# Altium PCB PSOC_LAY.PcbDoc (part 1 of 3)
Units mm, origin at the board's own origin, x right, y up, seen from the top; angles counter-clockwise.
Board outline 239.8 x 205.26 mm, 2 copper layers (Top Layer, Bottom Layer); 186 components, 165 nets, 780 pads, 226 vias.
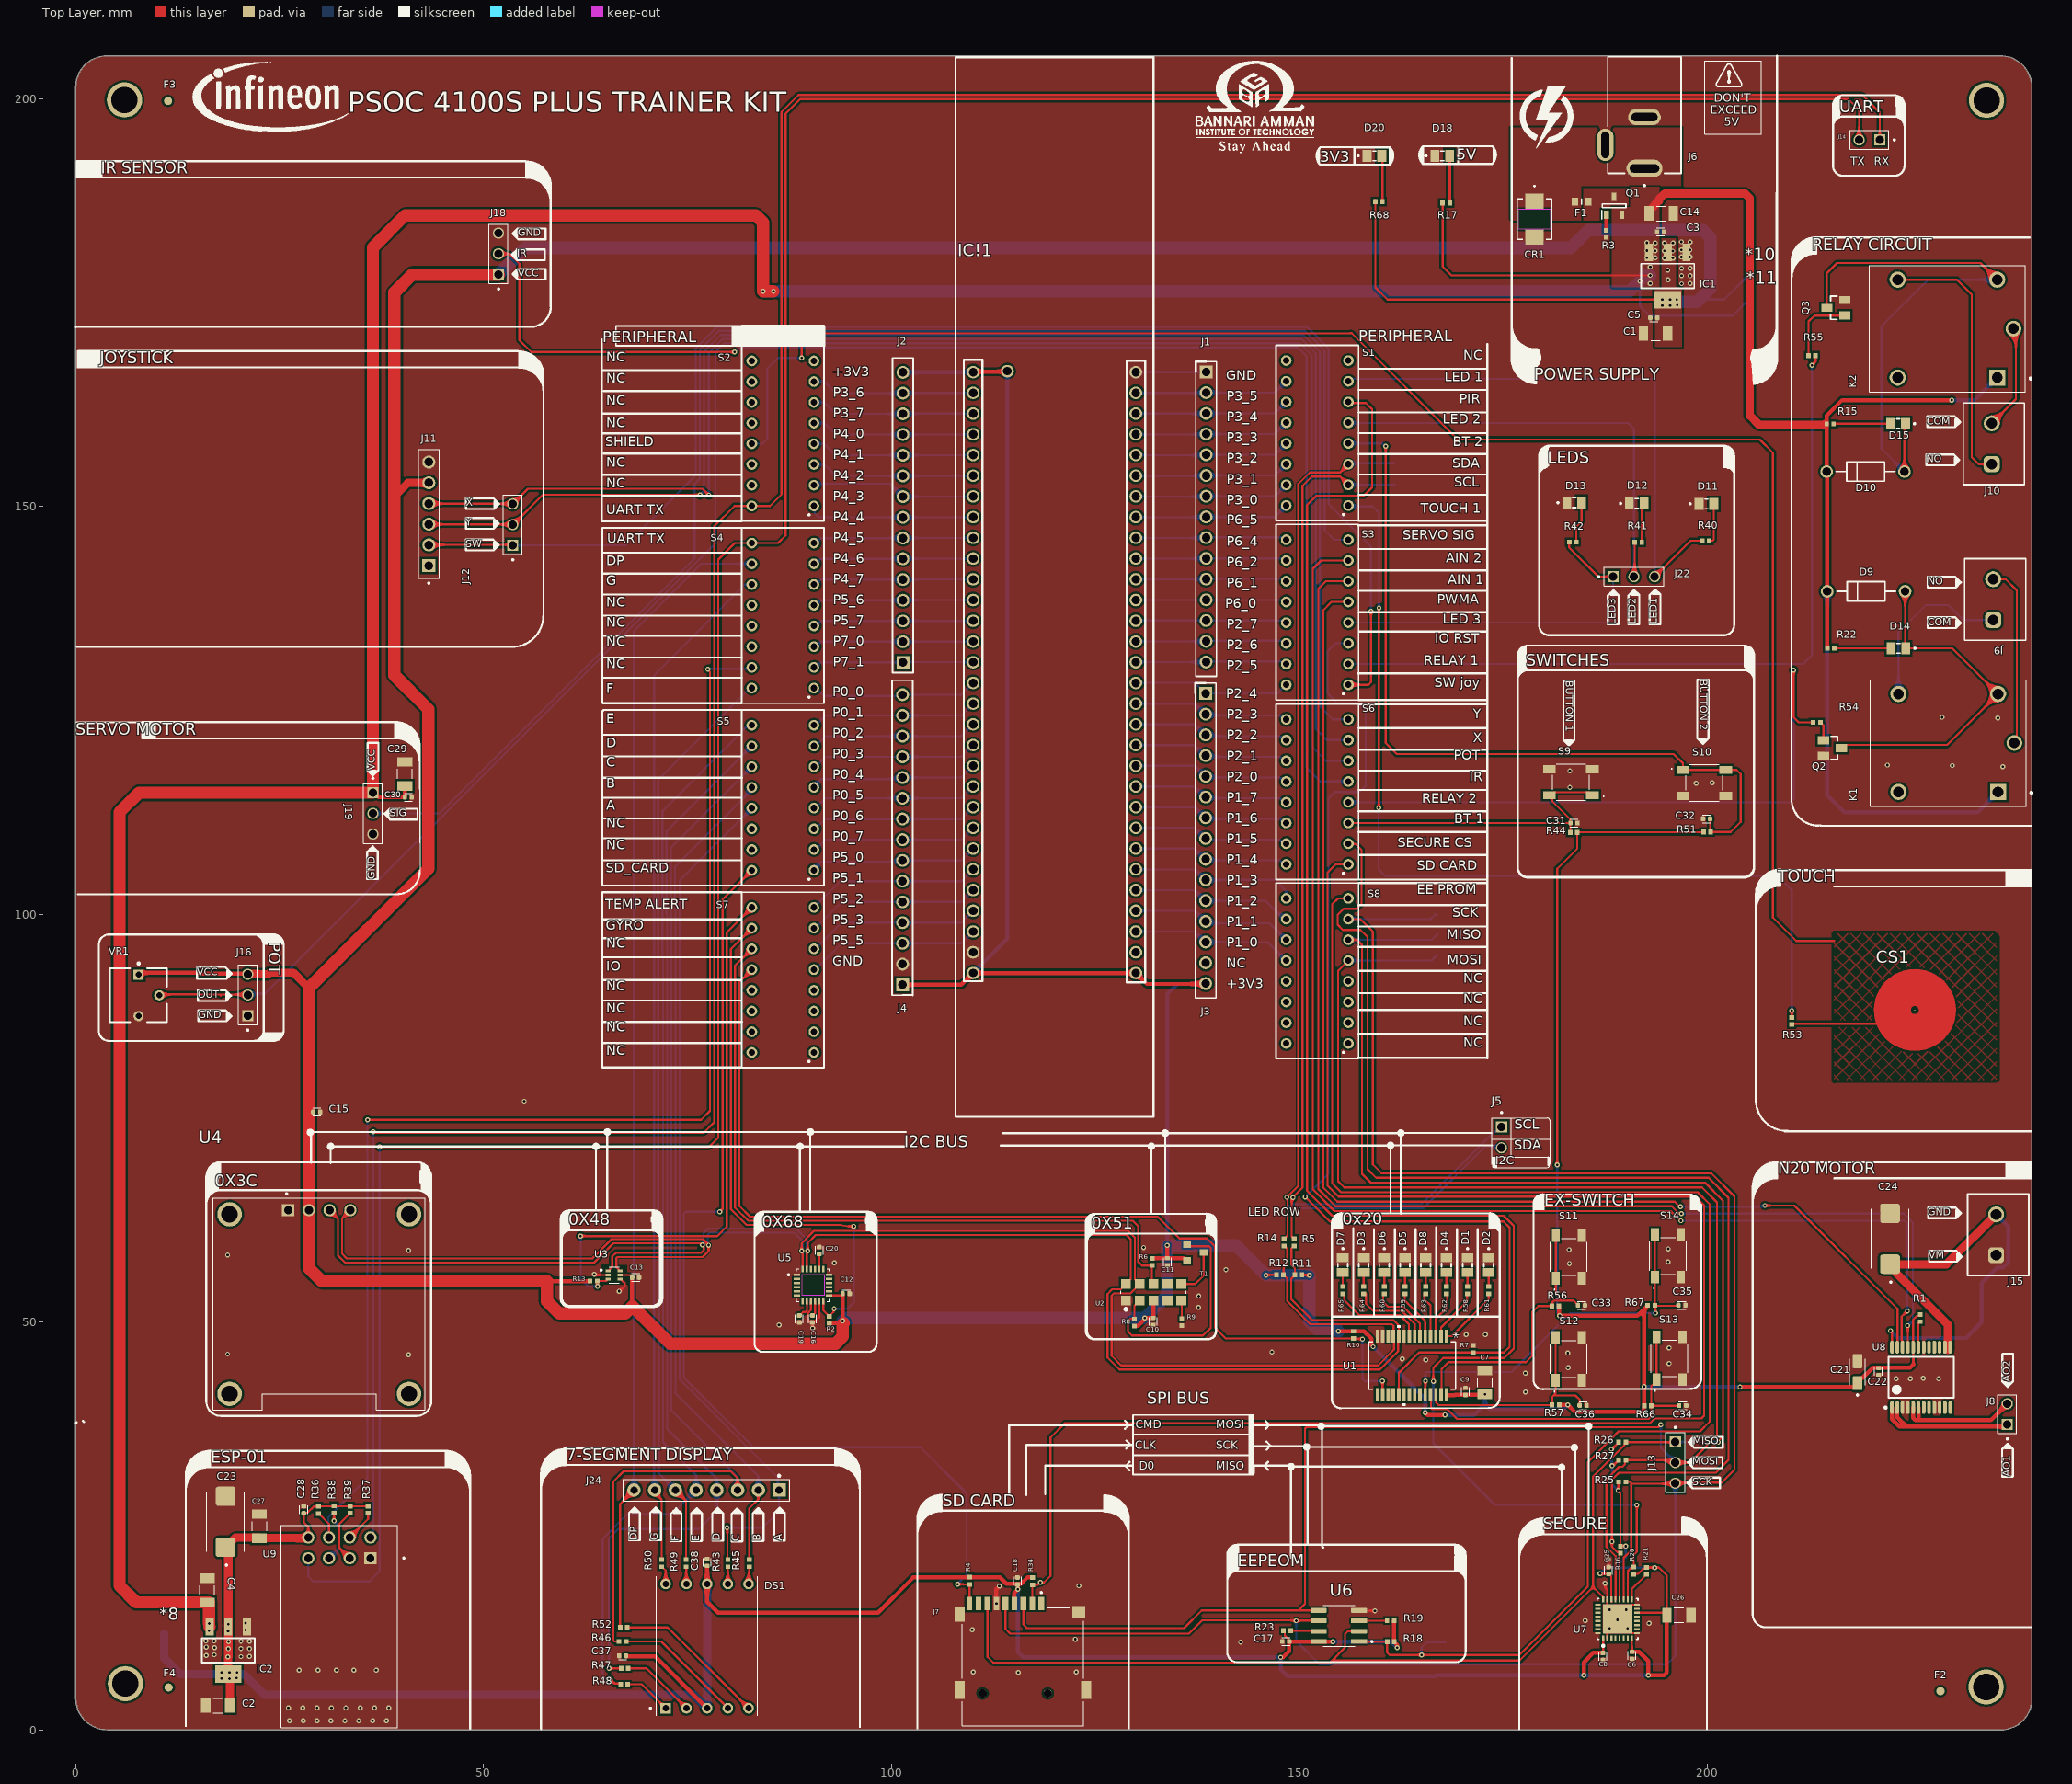
[diagram p0: Top Layer view]
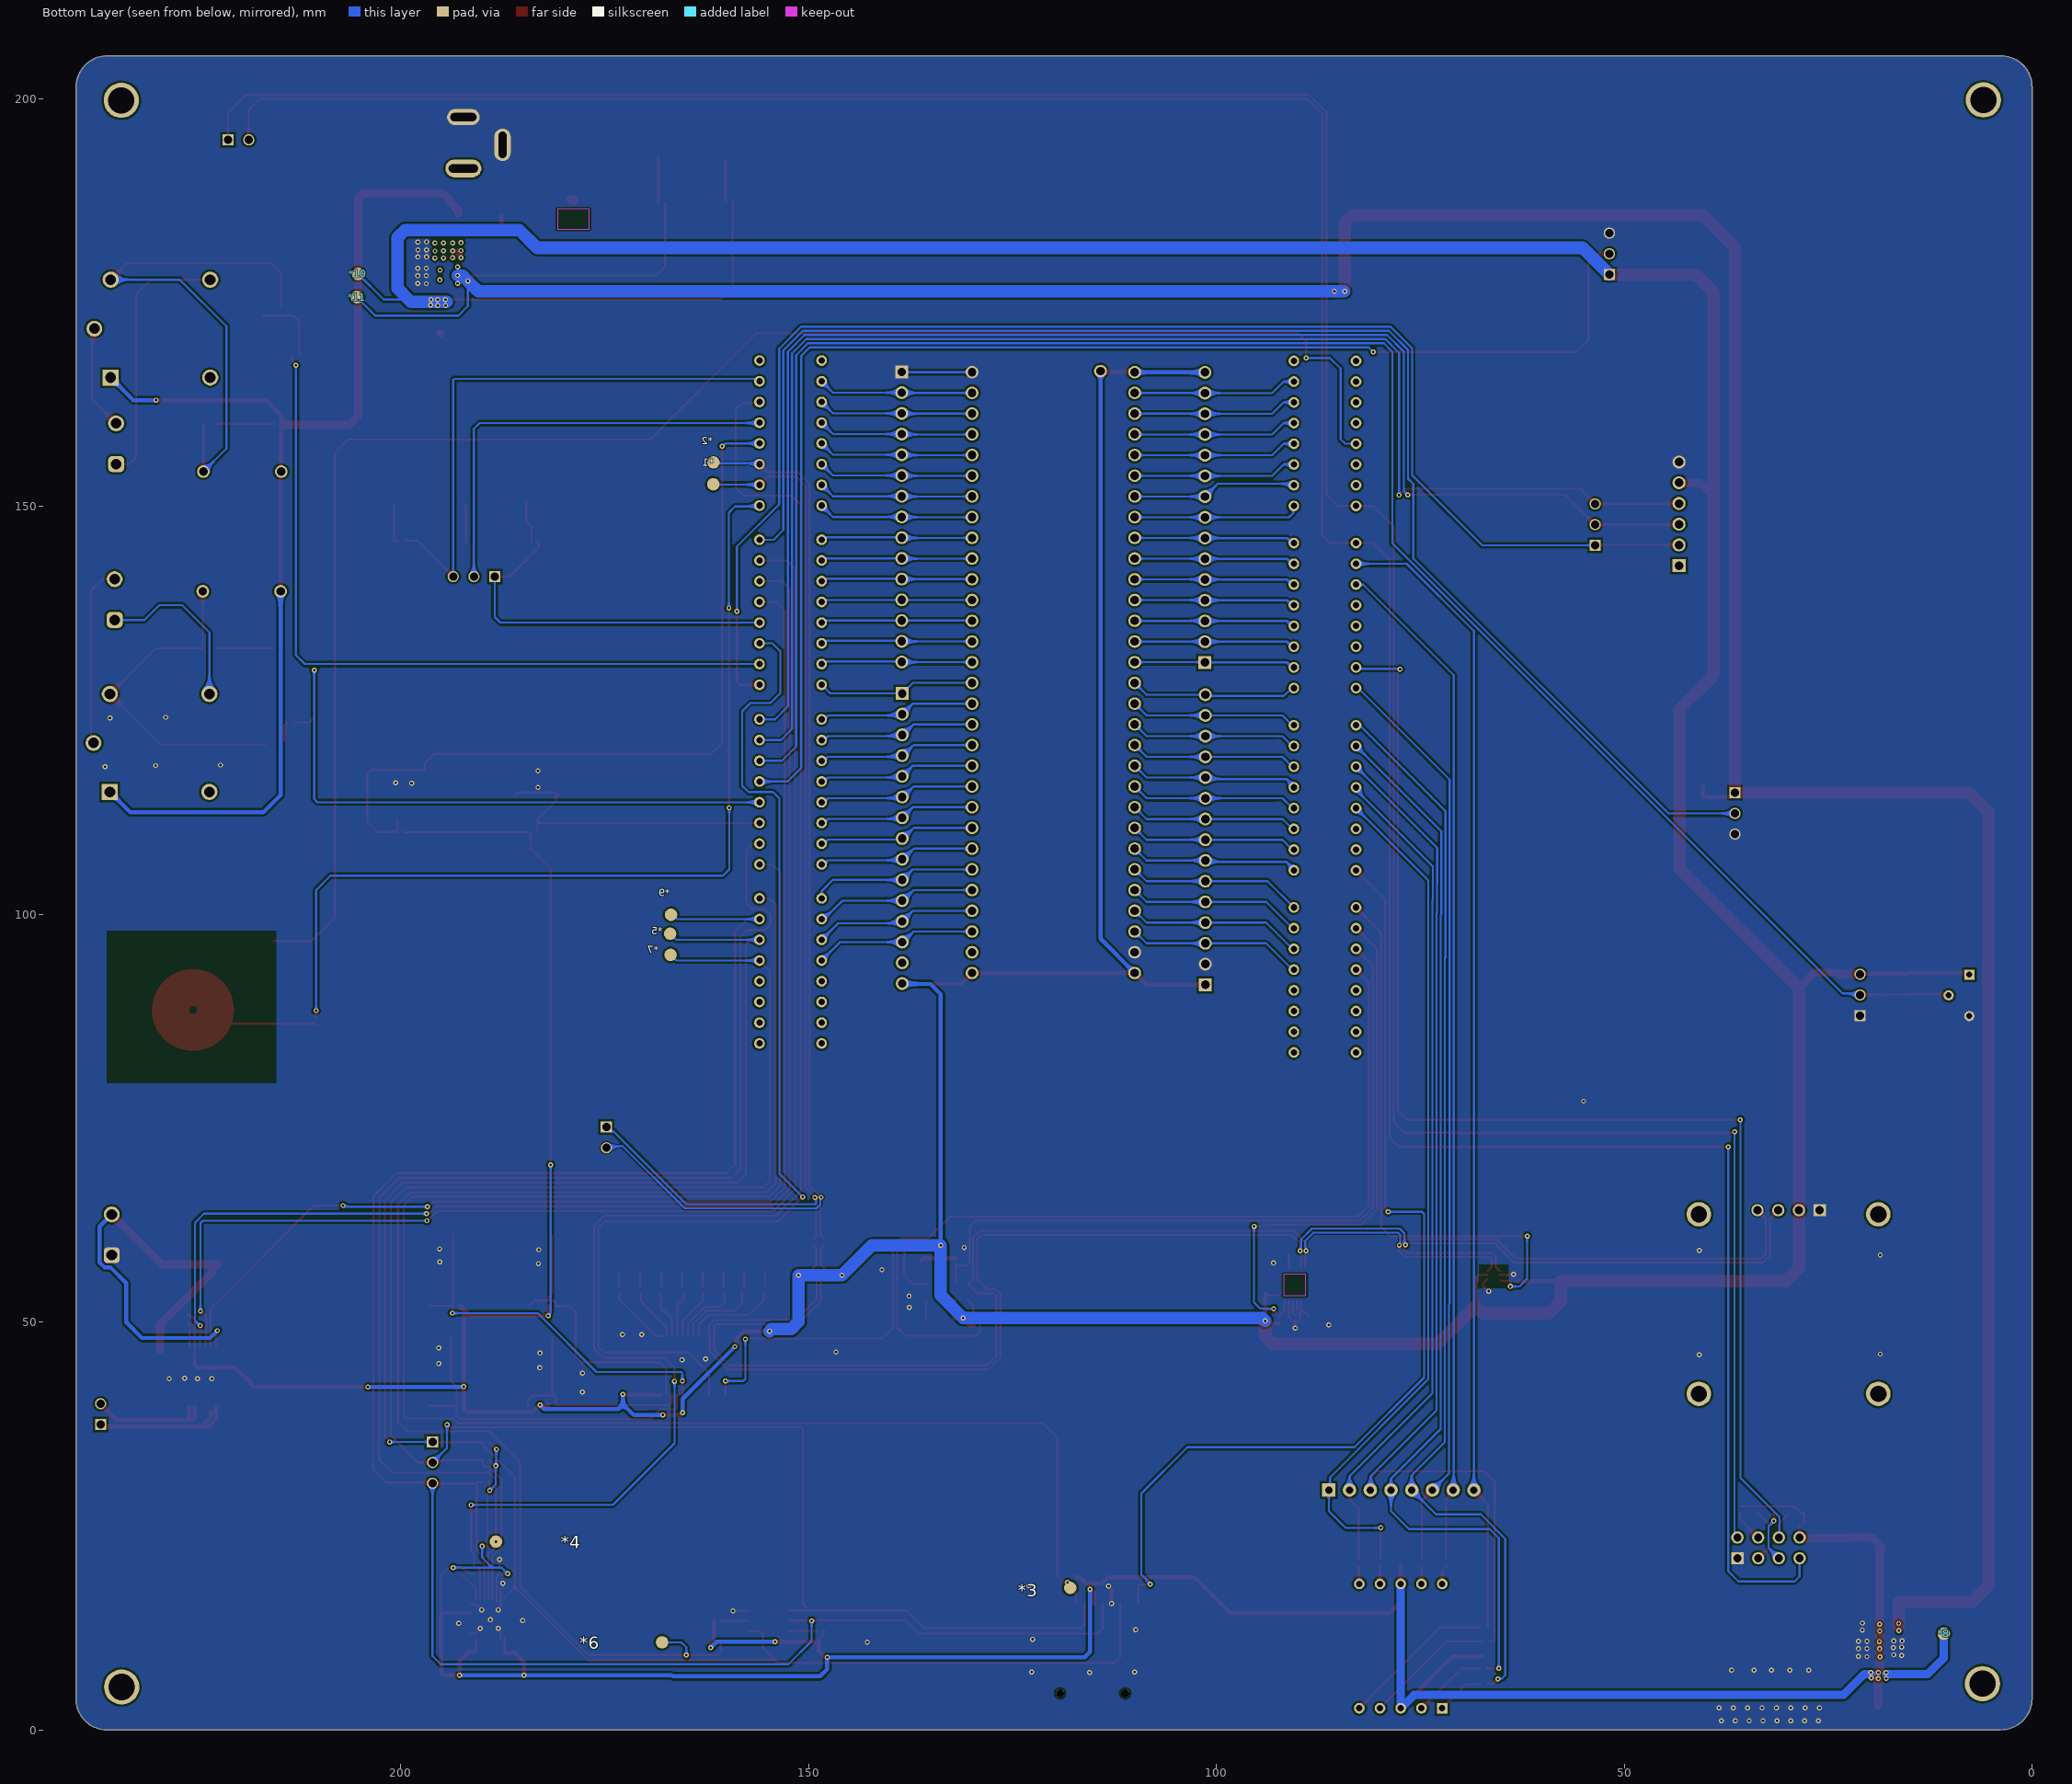
[diagram p1: Bottom Layer view, seen from below]
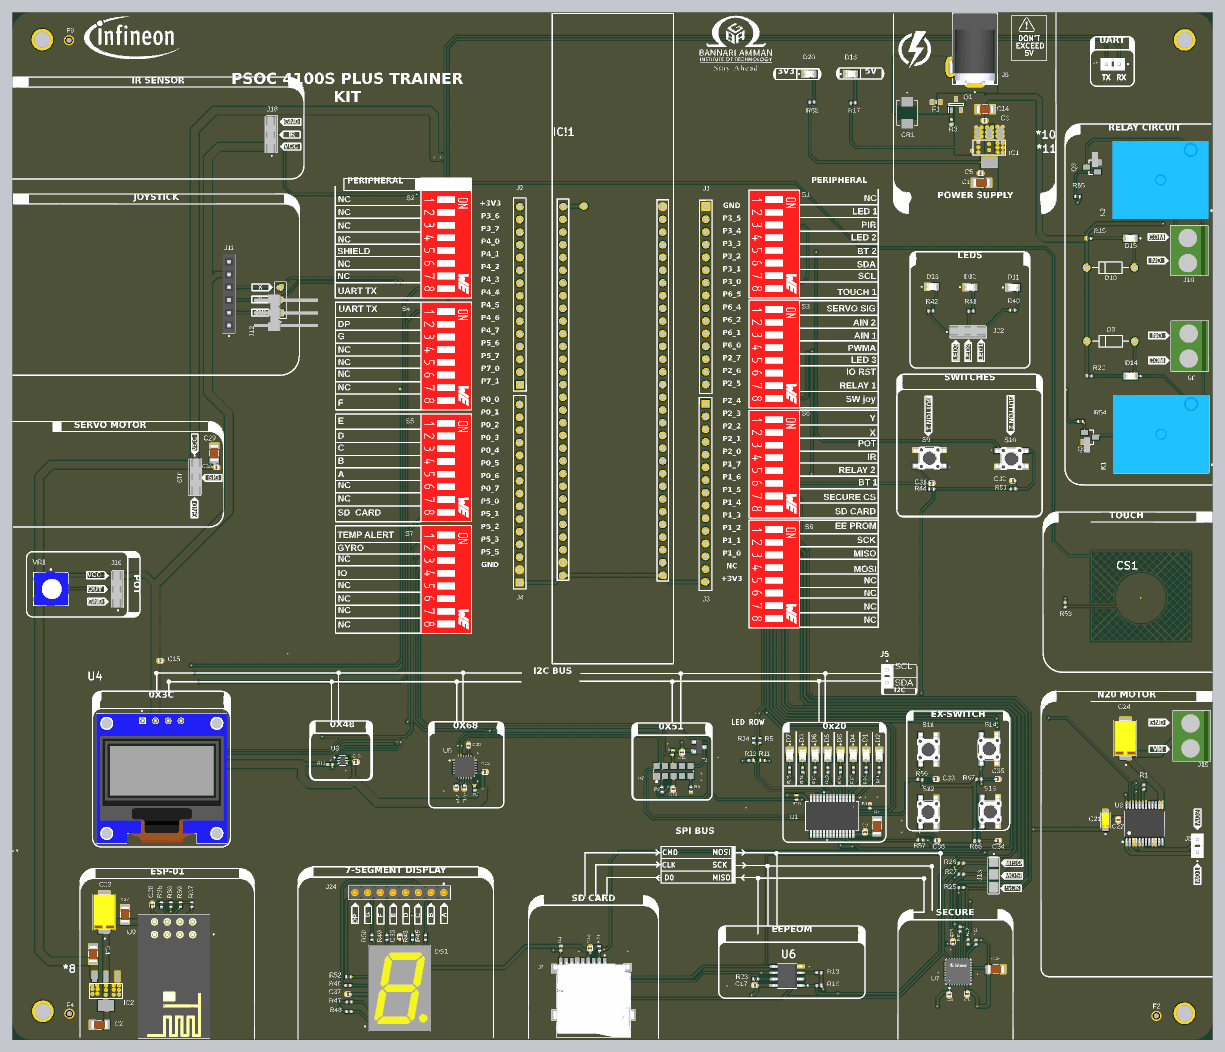
[diagram p3: 3D render of the assembled board from above, using the file's embedded part models]

## Layer stack, top to bottom
Top Solder: solder mask 0.0102, Solder Resist, Dk 3.5
Top Layer: signal copper 0.0356
Dielectric 1: dielectric 0.32, FR-4, Dk 4.8
Bottom Layer: signal copper 0.0356
Bottom Solder: solder mask 0.0102, Solder Resist, Dk 3.5

## Board outline
0,3.81 0,201.371 cw(c3.835,201.397) 3.81,205.232 235.915,205.232 cw(c235.941,201.397) 239.776,201.422 239.776,3.835 239.801,3.835 cw(c235.966,3.81) 235.991,-0.025 235.991,0 3.861,0 cw(c3.835,3.835)

## Design rules (kind name [scope] priority, off if disabled: settings)
Clearance Clearance_10 [InNet('GND') vs InNet('3V3')] p1: gap=0.254 ignorepadtopadclearanceinfootprint=FALSE
Clearance Clearance_6 [InNet('VCC')] p2: gap=0.254 ignorepadtopadclearanceinfootprint=FALSE
Clearance Clearance_9 [InNet('S_N')] p3: gap=0.127 ignorepadtopadclearanceinfootprint=FALSE
Clearance Clearance_8 [InNet('S_P') vs InNet('S_N')] p4: gap=0.127 ignorepadtopadclearanceinfootprint=FALSE
Clearance Clearance_7 [InNet('MISO_3V3') vs InNet('GND')] p5: gap=0.127 ignorepadtopadclearanceinfootprint=FALSE
Clearance Clearance_5 [InNet('NetR21_2') vs InNet('PIR_3V3')] p6: gap=0.127 ignorepadtopadclearanceinfootprint=FALSE
Clearance Clearance_4 [InNet('SCK_3V3') vs InNet('PIR_3V3')] p7: gap=0.127 ignorepadtopadclearanceinfootprint=FALSE
Clearance Clearance_3 [InNet('SECURE_CS_3V3') vs InNet('SCK_3V3')] p8: gap=0.127 ignorepadtopadclearanceinfootprint=FALSE
Clearance Clearance_2 [InNet('MOSI_3V3') vs InNet('SECURE_CS_3V3')] p9: gap=0.127 ignorepadtopadclearanceinfootprint=FALSE
Clearance Clearance_1 [InNet('MOSI_3V3') vs InNet('VCC')] p10: gap=0.127 ignorepadtopadclearanceinfootprint=FALSE
Clearance [All] p11: gap=0.254 ignorepadtopadclearanceinfootprint=FALSE
DiffPairsRouting [All] p1: maxlimit=0.254 minlimit=0.254 mostfreqgap=0.254 toplayer_minwidth=0.254 toplayer_maxwidth=0.381 toplayer_prefwidth=0.254 bottomlayer_minwidth=0.254 bottomlayer_maxwidth=0.381 bottomlayer_prefwidth=0.254 maxuncoupledlength=12.7
FabricationTestpoint [All] p1: side=3 testpointundercomponent=TRUE minsize=1.016 maxsize=5.08 preferedsize=1.524 minholesize=0 maxholesize=1.016 preferedholesize=0.813 testpointgrid=0.025 allowsidetop=TRUE allowsidebottom=TRUE usegrid=TRUE gridtolerance=0
PlaneConnect [All] p1: planeconnectstyle=Direct reliefexpansion=0.508 reliefentries=4 reliefconductorwidth=0.254 reliefairgap=0.254
PolygonConnect [All] p1: connectstyle=Direct reliefconductorwidth=0.254 reliefentries=4 polygonreliefangle="90 Angle" airgapwidth=0.254
RoutingVias RoutingVias_2 [InNet('VCC')] p1: holewidth=0.61 width=1.219 viastyle="Through Hole" minholewidth=0.305 minwidth=0.61 maxholewidth=0.305 maxwidth=0.61
RoutingVias RoutingVias_1 [InNet('+5')] p2: holewidth=0.305 width=0.61 viastyle="Through Hole" minholewidth=0.305 minwidth=0.61 maxholewidth=0.61 maxwidth=1.219
RoutingVias [All] p3: holewidth=0.305 width=0.61 viastyle="Through Hole" minholewidth=0.305 minwidth=0.61 maxholewidth=0.305 maxwidth=0.61
SolderMaskExpansion [All] p1: expansion=0.102 istentingtop=FALSE
SupplyNets "Schematic Supply Nets_2" [InNet('3V3')] p1: voltage=0.000
SupplyNets "Schematic Supply Nets_1" [InNet('VCC')] p2: voltage=0.000
SupplyNets "Schematic Supply Nets" [InNet('GND')] p3: voltage=0.000
SupplyNets "Schematic Supply Nets_4" [InNet('+5')] p4: voltage=0.000
Width Width_2 [InNet('+5')] p1: maxlimit=1.5 minlimit=0.254 preferedwidth=0.5
Width Width_1 [InNet('VCC')] p2: maxlimit=1.524 minlimit=0.254 preferedwidth=0.508
Width [All] p3: maxlimit=1.016 minlimit=0.254 preferedwidth=0.508
27 further rules are at their usual default settings.

## Classes and differential pairs
component class PSOC_PERI_2: *1 *2 *3 *4 *5 *6 *7 *8 *9 *10 *11 C33 C34 C35 C36 CS1 D1 D2 D3 D4 D5 D6 D7 D8 D9 D10 D14 D15 F2 F3 F4 J9 J10 J11 J12 K1 K2 Q2 Q3 R15 R22 R53 R54 R55 R56 R57 R58 R59 R60 R61 R62 R63 R64 R65 R66 R67 S11 S12 S13 S14
component class PSOC_SPI_BUS: C6 C8 C17 C18 C25 C26 J7 J13 R4 R16 R18 R19 R20 R21 R23 R25 R26 R27 R34 U6 U7
component class PSOC_PERI: C21 C22 C23 C24 C27 C28 C29 C30 C31 C32 C37 C38 D11 D12 D13 DS1 J8 J14 J15 J16 J18 J19 J22 J24 R1 R36 R37 R38 R39 R40 R41 R42 R43 R44 R45 R46 R47 R48 R49 R50 R51 R52 S9 S10 U8 U9 VR1
component class PSOC_I2C_BUS: C7 C9 C10 C11 C12 C13 C15 C16 C19 C20 J5 R2 R5 R6 R7 R8 R9 R10 R11 R12 R13 R14 T1 U1 U2 U3 U4 U5
component class PSOC_ControllerSchDoc: C1 C2 C3 C4 C5 C14 CR1 D18 D20 F1 IC1 IC2 IC!1 J1 J2 J3 J4 J6 Q1 R3 R17 R68 S1 S2 S3 S4 S5 S6 S7 S8
differential pair S: +S_P -S_N

## Components (designator, comment, footprint, x,y, rotation, side; value= is the part's Value field where it differs from the comment)
*1 "Tp" TP#1 161.671,152.705 r0 top
*2 "Tp" TP#1 161.646,155.372 r0 top
*3 "Tp" TP#2 117.907,17.399 r180 bottom
*4 "Tp" TP#2 188.316,23.063 r180 bottom
*5 "Tp" TP#1 166.954,97.587 r0 top
*6 "Tp" TP#2 167.945,10.719 r180 bottom
*7 "Tp" TP#1 166.903,94.996 r0 top
*8 "Tp" TP#1 10.82,11.786 r0 top
*9 "Tp" TP#1 166.853,99.924 r0 top
*10 "Tp" TP#1 205.207,178.486 r90 top
*11 "Tp" TP#1 205.359,175.641 r0 top
C1 "10uf" CAPC3216X229N 193.65,171.221 r0 top
C2 "10uf" CAPC3216X229N 17.399,2.972 r0 top
C3 "0.1uf" CAPC1005X55N 194.259,183.642 r0 top
C4 "10uf" CAPC3216X229N 16.104,17.096 r270 top
C5 "0.1uf" CAPC1005X55N 193.446,173.101 r180 top
C6 "0.1uf" CAPC1005X55N 190.779,9.119 r270 top
C7 "10uf" CAPC3216X229N 172.745,42.596 r90 top
C8 "0.1uf" CAPC1005X55N 187.223,8.99 r270 top
C9 "0.1uf" CAPC1005X55N 170.358,41.478 r270 top
C10 "0.1uf" CAPC1005X55N 132.08,50.063 r90 top
C11 "2.2uf" CAPC1005X55N 133.807,57.379 r270 top
C12 "0.1uf" CAPC1005X55N 94.437,53.467 r180 top
C13 "0.1uf" CAPC1005X55N 68.631,55.448 r180 top
C14 "10uf" CAPC3216X229N 194.359,185.903 r180 top
C15 "0.1uf" CAPC1005X55N 29.54,75.743 r180 top
C16 "0.1uf" CAPC1005X55N 90.297,50.368 r270 top
C17 "0.1uf" CAPC1005X55N 148.338,10.825 r0 top
C18 "0.1uf" CAPC1005X55N 115.443,18.248 r270 top
C19 "10nf" CAPC1005X55N 88.702,50.368 r270 top
C20 "2.2nf" CAPC1005X55N 91.135,58.75 r90 top
C21 "T491A106K016AG" CAPMP3216X180N 218.415,43.84 r90 top
C22 "0.1uf" CAPC1005X55N 221.005,43.917 r270 top
C23 "T491D227K016AT" CAPPM7343X310N 18.364,25.496 r90 top
C24 "T491D227K016AT" CAPPM7343X310N 222.402,60.198 r90 top
C25 "0.1uf" CAPC1005X55N 187.909,19.533 r90 top
C26 "10uf" CAPC3216X229N 196.52,14.046 r180 top
C27 "10uf" CAPC3216X229N 22.504,24.968 r270 top
C28 "0.1uf" CAPC1005X55N 27.94,26.975 r90 top
C29 "10uf" CAPC3216X229N 40.335,117.196 r270 top
C30 "0.1uf" CAPC1005X55N 40.767,114.351 r0 top
C31 "0.1uf" CAPC1005X55N 183.666,111.176 r0 top
C32 "0.1uf" CAPC1005X55N 199.923,111.684 r180 top
C33 "0.1uf" CAPC1005X55N 184.582,52.045 r0 top
C34 "0.1uf" CAPC1005X55N 196.977,39.751 r0 top
C35 "0.1uf" CAPC1005X55N 196.897,52.045 r0 top
C36 "0.1uf" CAPC1005X55N 184.785,39.772 r0 top
C37 "0.1uf" CAPC1005X55N 67.031,9.068 r180 top
C38 "0.1uf" CAPC1005X55N 77.394,20.523 r90 top
CR1 "SMBJ5.0A" DO-214AASMB_J-BEND_LTF 178.816,185.214 r270 top
CS1 "CircularButton" ? 225.45,88.24 r0 top
D1 "led" LEDC2012X120N 170.612,56.972 r270 top
D2 "led" LEDC2012X120N 173.203,56.972 r270 top
D3 "led" LEDC2012X120N 157.886,56.972 r270 top
D4 "led" LEDC2012X120N 168.021,56.972 r270 top
D5 "led" LEDC2012X120N 162.941,56.972 r270 top
D6 "led" LEDC2012X120N 160.401,56.972 r270 top
D7 "led" LEDC2012X120N 155.321,56.972 r270 top
D8 "led" LEDC2012X120N 165.481,56.972 r270 top
D9 "1n4007" ONSC-AXIAL_LEAD-2-59-10_P 219.481,139.573 r0 top
D10 "1n4007" ONSC-AXIAL_LEAD-2-59-10_P 219.405,154.254 r0 top
D11 "LED1" LEDC2012X120N 199.898,150.292 r0 top
D12 "LED2" LEDC2012X120N 191.364,150.343 r0 top
D13 "LED3" LEDC2012X120N 183.693,150.444 r0 top
D14 "LED2" LEDC2012X120N 223.444,132.588 r180 top
D15 "LED2" LEDC2012X120N 223.407,160.122 r180 top
D18 "led" LEDC2012X120N 167.513,192.964 r0 top
D20 "led" LEDC2012X120N 159.19,192.964 r0 top
DS1 "HDSP-511Y" LED_HDSP-511Y 77.394,10.262 r0 top
F1 "0467003.NRHF" FUSC1608X43N 184.582,187.35 r180 top
F2 "FIDUCIAL" FIDUCIAL-1MM 228.591,4.738 r0 top
F3 "FIDUCIAL" FIDUCIAL-1MM 11.303,199.695 r0 top
F4 "FIDUCIAL" FIDUCIAL-1MM 11.379,5.182 r0 top
IC1 "NCP1117" SOT223-3 195.148,178.232 r180 top
IC2 "NCP1117" SOT223-3 18.694,9.728 r180 top
IC!1 "PSOC" PCBCOMPONENT_1 107.721,54.813 r0 top
J1 "PPTC151LFBN-RC" RHDR15W85P0X254_1X15_3708X254X850P 138.557,166.472 r270 top
J2 "PPTC151LFBN-RC" RHDR15W85P0X254_1X15_3708X254X850P 101.397,130.861 r90 top
J3 "PPTC151LFBN-RC" RHDR15W85P0X254_1X15_3708X254X850P 138.506,127.051 r270 top
J4 "PPTC151LFBN-RC" RHDR15W85P0X254_1X15_3708X254X850P 101.346,91.338 r90 top
J5 "3-644456-2" TE_3-644456-2 174.777,73.889 r270 top
J6 "DCJ200-10-A-XX-K_REVA" GCT_DCJ200-10-A-XX-K_REVA 192.303,197.964 r180 top
J7 "MSD-1-A" CUI_MSD-1-A 116.101,7.72 r0 top
J8 "3-644456-2" TE_3-644456-2 236.779,37.44 r90 top
J9 "691137710002" 691137710002 235.302,138.568 r90 top
J10 "691137710002" 691137710002 235.124,157.669 r90 top
J11 "PPTC061LFBN-RC_1" SULLINS_PPTC061LFBN-RC 43.282,149.073 r90 top
J12 "644884-3" TE_644884-3 53.569,145.212 r90 top
J13 "644884-3" TE_644884-3 196.088,35.306 r270 top
J14 "3-644456-2" TE_3-644456-2 221.158,194.92 r180 top
J15 "691137710002" 691137710002 235.661,60.681 r90 top
J16 "644884-3" TE_644884-3 21.082,87.554 r90 top
J18 "644884-3" TE_644884-3 51.816,178.41 r90 top
J19 "644884-3" TE_644884-3 36.424,114.884 r270 top
J22 "644884-3" TE_644884-3 188.468,141.376 r0 top
J24 "825-22-008-10-001101" FP-825-22-008-10-001101_MFG 77.318,29.388 r180 top
K1 "SRD-05VDC-SL-C" RELAY_SRD-05VDC-SL-C 229.544,120.986 r180 top
K2 "SRD-05VDC-SL-C" RELAY_SRD-05VDC-SL-C 229.438,171.78 r180 top
Q1 "IRLML2244" SOT95P230X110-3N 188.57,186.842 r90 top
Q2 "MMBT2222*" SOT23-BEC 215.341,120.371 r270 top
Q3 "MMBT2222*" SOT23-BEC 215.765,174.335 r90 top
R1 "10K" RESC1005X40N#1 226.111,50.467 r90 top
R2 "10K" RESC1005X40N#1 92.354,50.27 r270 top
R3 "100K" RESC1005X40N#1 187.604,183.388 r270 top
R4 "10K" RESC1005X40N#1 109.601,18.263 r270 top
R5 "22E" RESC1005X40N#1 149.352,59.766 r90 top
R6 "10K" RESC1005X40N#1 131.928,57.353 r90 top
R7 "10K" RESC1005X40N#1 171.323,46.685 r90 top
R8 "1k" RESC1005X40N#1 129.769,49.936 r270 top
R9 "2.7E" RESC1005X40N#1 135.585,49.987 r270 top
R10 "10K" RESC1005X40N#1 156.642,48.412 r270 top
R11 "4.7k" RESC1005X40N#1 149.885,55.778 r0 top
R12 "4.7K" RESC1005X40N#1 147.625,55.778 r180 top
R13 "10K" RESC1005X40N#1 63.475,55.016 r180 top
R14 "22E" RESC1005X40N#1 148.133,59.766 r90 top
R15 "RC0402FR-071KL" RESC1005X40N#2 215.062,160.096 r180 top
R16 "10K" RESC1005X40N#1 189.357,22.073 r270 top
R17 "330E" RESC1005X40N#1 167.996,187.173 r180 top
R18 "10K" RESC1005X40N#1 161.188,10.795 r0 top
R19 "10K" RESC1005X40N#1 161.185,13.386 r0 top
R20 "10K" RESC1005X40N#1 190.983,19.507 r90 top
R21 "10K" RESC1005X40N#1 192.557,19.482 r270 top
R22 "RC0402FR-071KL" RESC1005X40N#2 215.138,132.613 r180 top
R23 "10K" RESC1005X40N#1 148.488,12.141 r0 top
R25 "10K" RESC1005X40N#1 189.586,30.378 r180 top
R26 "10K" RESC1005X40N#1 189.586,35.255 r180 top
R27 "10K" RESC1005X40N#1 189.586,33.062 r180 top
R34 "10K" RESC1005X40N#1 117.283,18.212 r270 top
R36 "10K" RESC1005X40N#1 29.743,26.949 r270 top
R37 "10K" RESC1005X40N#1 35.839,26.975 r270 top
R38 "10K" RESC1005X40N#1 31.674,27 r90 top
R39 "10K" RESC1005X40N#1 33.63,26.975 r90 top
R40 "220R" RESC1005X40N#1 199.822,145.771 r0 top
R41 "220R" RESC1005X40N#1 191.541,145.593 r0 top
R42 "220R" RESC1005X40N#1 183.515,145.618 r0 top
R43 "220R" RESC1005X40N#1 79.934,20.422 r90 top
R44 "10K" RESC1005X40N#1 183.637,110.007 r0 top
R45 "220R" RESC1005X40N#1 82.575,20.422 r90 top
R46 "220R" RESC1005X40N#1 67.034,10.82 r180 top
R47 "220R" RESC1005X40N#1 67.285,7.544 r180 top
R48 "220R" RESC1005X40N#1 67.223,5.588 r180 top
R49 "220R" RESC1005X40N#1 74.803,20.422 r90 top
R50 "220R" RESC1005X40N#1 71.831,20.422 r90 top
R51 "10K" RESC1005X40N#1 199.974,110.059 r0 top
R52 "220R" RESC1005X40N#1 67.161,12.548 r180 top
R53 "560ohm" RESC1005X40N#1 210.363,86.893 r90 top
R54 "1k" RESC1005X40N#1 213.436,123.52 r180 top
R55 "1k" RESC1005X40N#1 212.849,168.453 r0 top
R56 "10K" RESC1005X40N#1 181.385,51.943 r0 top
R57 "10K" RESC1005X40N#1 181.419,39.843 r0 top
R58 "220ohm" RESC1005X40N#1 170.612,53.899 r90 top
R59 "220ohm" RESC1005X40N#1 162.941,53.899 r90 top
R60 "220ohm" RESC1005X40N#1 160.401,53.899 r90 top
R61 "220ohm" RESC1005X40N#1 173.203,53.899 r90 top
R62 "220ohm" RESC1005X40N#1 168.021,53.899 r90 top
R63 "220ohm" RESC1005X40N#1 165.481,53.899 r90 top
R64 "220ohm" RESC1005X40N#1 157.886,53.899 r90 top
R65 "220ohm" RESC1005X40N#1 155.321,53.899 r90 top
R66 "10K" RESC1005X40N#1 192.699,39.7 r180 top
R67 "10K" RESC1005X40N#1 193.139,52.028 r180 top
R68 "330E" RESC1005X40N#1 159.749,187.35 r180 top
S1 "418117270908" 418117270908 152.197,158.979 r90 top
S2 "418117270908" 418117270908 86.683,158.934 r90 top
S3 "418117270908" 418117270908 152.197,137.008 r90 top
S4 "418117270908" 418117270908 86.683,136.599 r90 top
S5 "418117270908" 418117270908 86.683,114.264 r90 top
S6 "418117270908" 418117270908 152.197,114.986 r90 top
S7 "418117270908" 418117270908 86.683,91.929 r90 top
S8 "418117270908" 418117270908 152.197,93.04 r90 top
S9 "PTS647SK38SMTR2LFS" PTS647SK38SMTR2LFS 183.286,116.18 r180 top
S10 "PTS647SK38SMTR2LFS" PTS647SK38SMTR2LFS 199.644,116.078 r0 top
S11 "PTS647SK38SMTR2LFS" PTS647SK38SMTR2LFS 183.032,57.972 r90 top
S12 "PTS647SK38SMTR2LFS" PTS647SK38SMTR2LFS 183.007,45.466 r90 top
S13 "PTS647SK38SMTR2LFS" PTS647SK38SMTR2LFS 195.377,45.551 r90 top
S14 "PTS647SK38SMTR2LFS" PTS647SK38SMTR2LFS 195.174,58.115 r90 top
T1 "IRLML2244TRPBF" SOT-23 137.236,58.496 r0 top
U1 "CY8C9520A-24PVXIT" SSOP-28 163.801,44.66 r270 top
U2 "VCNL4200" SENSOR_VCNL4200 132.131,53.645 r90 top
U3 "TMP102AIDRLR" SOT50P160X60-6N 65.989,55.753 r0 top
U4 "DM-OLED096-636" MODULE_DM-OLED096-636 29.845,52.197 r0 top
U5 "MPU-6050" QFN50P400X400X95-24N 90.377,54.523 r0 top
U6 "M95M04-DRMN6TP" SOIC127P600X175-8N 154.838,12.725 r180 top
U7 "SLB 9670VQ2.0" QFN50P500X500X90-33N-V 189.001,13.589 r90 top
U8 "TB6612FNG" TOSH-SSOP-24_M 226.212,43.205 r90 top
U9 "ESP-01" MODULE_ESP-01 32.309,12.675 r180 top
VR1 "3362P-1-103LF" BOUR-3362P 7.661,90.043 r270 top

## Footprints (in the part's own frame and the unit in brackets; to place one, negate y for a bottom-side part, rotate by r counter-clockwise, add the part's x,y. Pads: shape width x height; smd on the part's side, far side on the other; paste and mask are expansions set on the pad)
418117270908 [mm]
  round 1.308 hole 0.8: 1(-8.89,-3.81) 2(-6.35,-3.81) 3(-3.81,-3.81) 4(-1.27,-3.81) 5(1.27,-3.81) 6(3.81,-3.81) 7(6.35,-3.81) 8(8.89,-3.81) A1(-8.89,3.81) A2(-6.35,3.81) A3(-3.81,3.81) A4(-1.27,3.81) A5(1.27,3.81) A6(3.81,3.81) A7(6.35,3.81) A8(8.89,3.81)
  silkscreen extent -10.76,-5.05 10.76,5.05, body extent -10.66,-4.95 10.66,4.95, height 6.45
691137710002 [mm] "Horizontal Cable Entry with Pressure Clamp, pitch 5mm, 02p"
  rrect50% 1.95x1.95 hole 1.3: 1(-2.5,0.25)
  round 1.95 hole 1.3: 2(2.5,0.25)
  silkscreen extent -5,-3.75 5,3.75, body extent -5,-3.75 5,3.75, height 11.6
BOUR-3362P [mm] "THD, 3-Leads, Body 6.6x6.99mm, Pitch 2.54mm"
  rect 1.25x1.25 hole 0.75: 1(-2.54,0.035)
  round 1.25 hole 0.75: 2(0,2.575) 3(2.54,0.035)
  silkscreen extent -4.02,-3.49 3.3,3.49, body extent -3.3,-3.49 3.3,3.5, height 4.5
CAPC1005X55N [mm]
  rrect53% 0.54x0.6 smd paste+0 mask+0.102: 1(-0.43,0) 2(0.43,0)
  silkscreen extent -0.5,-0.48 0.5,0.48, body extent -0.5,-0.25 0.5,0.25, height 0.55
CAPC3216X229N [mm]
  rect 1.16x1.82 smd: 1(-1.475,0) 2(1.475,0)
  silkscreen extent -0.57,-0.9 0.57,0.9, body extent -1.6,-0.8 1.6,0.8, height 2.29
CAPMP3216X180N [mm]
  rrect25% 1.71x1.23 smd paste+0 mask+0.102: 1(-1.35,0) 2(1.35,0)
  silkscreen extent -2.9,-0.94 1.6,0.93, body extent -1.6,-0.8 1.6,0.8, height 1.8
CAPPM7343X310N [mm]
  rrect25% 2.37x2.43 smd: 1(-3.12,0) 2(3.12,0)
  silkscreen extent -5.41,-2.3 3.65,2.3, body extent -3.65,-2.15 3.65,2.15, height 3.1
CUI_MSD-1-A [mm]
  rect 0.7x1.6 smd: 1(2.25,7.75) 2(1.15,7.75) 3(0.05,7.75) 4(-1.05,7.75) 5(-2.15,7.75) 6(-3.25,7.75) 7(-4.35,7.75) 8(-5.45,7.75) CD(-6.55,7.75)
  rect 1.2x1.8 smd: G1(-7.75,6.45)
  rect 1.6x1.5 smd: G2(6.85,6.7)
  rect 1.2x2.2 smd: G3(-7.75,-2.85) G4(7.75,-2.85)
  round 1 hole 1 unplated: ""(-4.95,-3.25) ""(3.05,-3.25)
  silkscreen extent -7.42,-7.25 7.42,9.2, body extent -8.02,-7.24 8.13,7.81, height 1.8
DO-214AASMB_J-BEND_LTF [mm]
  rect 1.874x2.234 smd paste+0 mask+0: 1(-2.207,0) 2(2.207,0)
  Top Layer keep-out region: -1.219,-1.918 -1.219,1.918 1.219,1.918 1.219,-1.918
  Keep-Out Layer region: -1.219,-1.918 -1.219,1.918 1.219,1.918 1.219,-1.918
  silkscreen extent -4.11,-2.1 2.5,2.1
FIDUCIAL-1MM [mm] "1MM FIDUCAL MARKER"
  round 1 smd paste+0 mask+0.5: 1(0,0)
FP-825-22-008-10-001101_MFG [mm]
  rect 1.65x1.65 hole 0.91 paste-2539.97 mask+0: 1(-8.89,0)
  round 1.65 hole 0.91 paste-2539.97 mask+0: 2(-6.35,0) 3(-3.81,0) 4(-1.27,0) 5(1.27,0) 6(3.81,0) 7(6.35,0) 8(8.89,0)
  silkscreen extent -10.22,-1.87 10.22,1.34, body extent -10.32,-1.44 10.32,1.44, height 0.25
FUSC1608X43N [mm]
  rect 0.78x0.93 smd: 1(-0.825,0) 2(0.825,0)
  silkscreen extent 0,-0.31 0,0.31
GCT_DCJ200-10-A-XX-K_REVA [mm]
  oval 4.4x2.2 hole 1 slot 3.6 at 0 deg: 1(0,6.55)
  oval 4x2 hole 1 slot 3.2 at 0 deg: 2(0,0.25)
  oval 2x4 hole 1 slot 3.2 at 90 deg: 3(4.8,3.65)
  silkscreen extent -4.5,-7.15 4.5,8.75, body extent -4.5,-7.15 5.05,7.15, height 11
LED_HDSP-511Y [mm]
  rect 1.308x1.308 / inner round 1.308 / far side rect 1.308x1.308 hole 0.8: 1(-5.08,-7.62)
  round 1.308 hole 0.8: 2(-2.54,-7.62) 3(0,-7.62) 4(2.54,-7.62) 5(5.08,-7.62) 6(5.08,7.62) 7(2.54,7.62) 8(0,7.62) 9(-2.54,7.62) 10(-5.08,7.62)
  silkscreen extent -7.05,-8.55 6.2,8.55, body extent -6.2,-8.55 6.2,8.55, height 8
LEDC2012X120N [mm]
  rect 1.1x1.45 smd: A(0.9,0) C(-0.9,0)
  silkscreen extent -2.1,-0.6 0.2,0.6, body extent -1,-0.65 1,0.65, height 0.9
MODULE_DM-OLED096-636 [mm]
  rect 1.508x1.508 / inner round 1.508 / far side rect 1.508x1.508 hole 1: 1(-3.81,11.5)
  round 1.508 hole 1: 2(-1.27,11.5) 3(1.27,11.5) 4(3.81,11.5)
  round 3 hole 2: S1(-11,11) S2(11,11) S3(11,-11) S4(-11,-11)
  silkscreen extent -13,-13 13,13.6, body extent -13,-13 13,13, height 5.66
MODULE_ESP-01 [mm]
  rect 1.508x1.508 / inner round 1.508 / far side rect 1.508x1.508 hole 1: 1(-3.81,-8.36)
  round 1.508 hole 1: 2(-1.27,-8.36) 3(1.27,-8.36) 4(3.81,-8.36) 5(3.81,-10.9) 6(1.27,-10.9) 7(-1.27,-10.9) 8(-3.81,-10.9)
  silkscreen extent -8,-12.4 7.15,12.4, body extent -7.2,-12.35 7.2,12.35, height 6.5
ONSC-AXIAL_LEAD-2-59-10_P [mm] "AXIAL, 2-Leads, Diameter 2.35mm"
  round 1.55 hole 1.05: 1(-4.77,0) 2(4.77,0)
  silkscreen extent -3.6,-1.18 3.6,1.18
PCBCOMPONENT_1 [mil]
  oval 62.01x60 hole 41.34: 1(875,4395) 2(875,4295) 3(875,4195) 4(875,4095) 5(875,3995) 6(875,3895) 7(875,3795) 8(875,3695) 9(875,3595) 10(875,3495) 11(875,3395) 12(875,3295) 13(875,3195) 14(875,3095) 15(875,2995) 16(875,2895) 17(875,2795) 18(875,2695) 19(875,2595) 20(875,2495) 21(875,2395) 22(875,2295) 23(875,2195) 24(875,2095) 25(875,1995) 26(875,1895) 27(875,1795) 28(875,1695) 29(875,1595) 30(875,1495) 31(90,4395) 32(90,4295) 33(90,4195) 34(90,4095) 35(90,3995) 36(90,3895) 37(90,3795) 38(90,3695) 39(90,3595) 40(90,3495) 41(90,3395) 42(90,3295) 43(90,3195) 44(90,3095) 45(90,2995) 46(90,2895) 47(90,2795) 48(90,2695) 49(90,2595) 50(90,2495) 51(90,2395) 52(90,2295) 53(90,2195) 54(90,2095) 55(90,1995) 56(90,1895) 57(90,1795) 58(90,1695) 59(90,1595) 60(90,1495) 61(255,4400)
  silkscreen extent 5,800 960,5915
PTS647SK38SMTR2LFS [mm]
  rect 1.55x1 smd: 1(-2.625,1.6) 2(2.625,1.6) 3(-2.625,-1.6) 4(2.625,-1.6)
  silkscreen extent -4.05,-2.25 2.25,2.25, body extent -3.25,-2.25 3.25,2.25, height 3.8
QFN50P400X400X95-24N [mm]
  rect 0.79x0.28 smd: 1(-1.97,1.25) 2(-1.97,0.75) 3(-1.97,0.25) 4(-1.97,-0.25) 5(-1.97,-0.75) 6(-1.97,-1.25) 13(1.97,-1.25) 14(1.97,-0.75) 15(1.97,-0.25) 16(1.97,0.25) 17(1.97,0.75) 18(1.97,1.25)
  rect 0.28x0.79 smd: 7(-1.25,-1.97) 8(-0.75,-1.97) 9(-0.25,-1.97) 10(0.25,-1.97) 11(0.75,-1.97) 12(1.25,-1.97) 19(1.25,1.97) 20(0.75,1.97) 21(0.25,1.97) 22(-0.25,1.97) 23(-0.75,1.97) 24(-1.25,1.97)
  Keep-Out Layer region: 1.35,-1.3 -1.35,-1.3 -1.35,1.3 1.35,1.3
  silkscreen extent -3.1,-2 2,2, body extent -2,-2 2,2, height 0.93
QFN50P500X500X90-33N-V [mm] "QFN,0.50mm pitch,square;32 pin,5.00mm L X 5.00mm W X 0.90mm H body (w/thermal tab)"
  rect 0.7x0.25 smd paste+0 mask+0: 1(-2.4,1.75) 2(-2.4,1.25) 3(-2.4,0.75) 4(-2.4,0.25) 5(-2.4,-0.25) 6(-2.4,-0.75) 7(-2.4,-1.25) 8(-2.4,-1.75) 17(2.4,-1.75) 18(2.4,-1.25) 19(2.4,-0.75) 20(2.4,-0.25) 21(2.4,0.25) 22(2.4,0.75) 23(2.4,1.25) 24(2.4,1.75)
  rect 0.25x0.7 smd paste+0 mask+0: 9(-1.75,-2.4) 10(-1.25,-2.4) 11(-0.75,-2.4) 12(-0.25,-2.4) 13(0.25,-2.4) 14(0.75,-2.4) 15(1.25,-2.4) 16(1.75,-2.4) 25(1.75,2.4) 26(1.25,2.4) 27(0.75,2.4) 28(0.25,2.4) 29(-0.25,2.4) 30(-0.75,2.4) 31(-1.25,2.4) 32(-1.75,2.4)
  rect 3.6x3.6 smd paste+0 mask+0: 33(0,0)
  silkscreen extent -3.42,-2.5 2.5,2.5, body extent -2.5,-2.5 2.5,2.5, height 0.9
RELAY_SRD-05VDC-SL-C [mm]
  rect 1.98x1.98 / inner round 1.98 / far side rect 1.98x1.98 hole 1.32: A1(-6.1,6)
  round 1.98 hole 1.32: A2(-6.1,-6) NC(6.1,6) NO(6.1,-6)
  round 1.935 hole 1.29: COM(-8.1,0)
  silkscreen extent -10.3,-7.75 9.55,7.75, body extent -9.6,-7.8 9.6,7.8, height 15.8
RESC1005X40N#1 [mm]
  rect 0.56x0.6 smd paste+0 mask+0.102: 1(-0.435,0) 2(0.435,0)
  body extent -0.5,-0.25 0.5,0.25, height 0.4
RESC1005X40N#2 [mm]
  rect 0.54x0.6 smd: 1(-0.43,0) 2(0.43,0)
  body extent -0.5,-0.25 0.5,0.25, height 0.4
RHDR15W85P0X254_1X15_3708X254X850P [mm]
  rect 1.575x1.575 / inner round 1.575 / far side rect 1.575x1.575 hole 1.05: 1(0,0)
  round 1.575 hole 1.05: 2(2.54,0) 3(5.08,0) 4(7.62,0) 5(10.16,0) 6(12.7,0) 7(15.24,0) 8(17.78,0) 9(20.32,0) 10(22.86,0) 11(25.4,0) 12(27.94,0) 13(30.48,0) 14(33.02,0) 15(35.56,0)
  silkscreen extent -1.27,-1.27 37.33,1.27
SENSOR_VCNL4200 [mm]
  rect 1.2x1.2 smd: 1(-1,3.4) 2(-1,1.7) 3(-1,0) 4(-1,-1.7) 5(-1,-3.4) 6(1,-3.4) 7(1,-1.7) 8(1,0) 9(1,1.7) 10(1,3.4)
  silkscreen extent -2.25,-4 0.17,4
SOIC127P600X175-8N [mm]
  rrect25% 1.97x0.57 smd: 1(-2.475,1.905) 2(-2.475,0.635) 3(-2.475,-0.635) 4(-2.475,-1.905) 5(2.475,-1.905) 6(2.475,-0.635) 7(2.475,0.635) 8(2.475,1.905)
  silkscreen extent -4.16,-2.51 1.95,2.51, body extent -3,-2.45 3,2.45, height 1.75
SOT23-BEC [mm]
  rect 1x1.4 smd paste+0 mask+0.102: B(-0.95,-1.1) C(0,1.1) E(0.95,-1.1)
  silkscreen extent -1.42,-0.15 1.42,0.66, body extent 0,-1.2 3.04,0.1, height 2
SOT50P160X60-6N [mm]
  rect 0.66x0.31 smd: 1(-0.735,0.5) 2(-0.735,0) 3(-0.735,-0.5) 4(0.735,-0.5) 5(0.735,0) 6(0.735,0.5)
  silkscreen extent -1.7,-0.98 0.6,0.98, body extent -0.8,-0.8 0.8,0.8, height 0.6
SOT95P230X110-3N [mm]
  rect 1.05x0.6 smd: 1(-1.1,0.95) 2(-1.1,-0.95) 3(1.1,0)
  silkscreen extent -1.63,-1.45 0.23,1.5
SOT223-3 [mm]
  rect 1x2.15 smd paste+0 mask+0.102: 1(-2.3,-2.9) 2(0,-2.9) 3(2.3,-2.9)
  rect 3.25x2.15 smd paste+0 mask+0.102: 4(0,2.9)
  silkscreen extent -3.25,-1.5 3.25,1.5
SOT-23 [mil]
  rect 38.27x31.57 smd: 1(-40,38) 2(-40,-38) 3(40,0)
  body extent -49,-57 49,57, height 44
SSOP-28 [mil]
  rect 63.5x17 smd paste+0 mask+0: 1(-141.75,166.34) 2(-141.75,140.75) 3(-141.75,115.16) 4(-141.75,89.57) 5(-141.75,63.98) 6(-141.75,38.39) 7(-141.75,12.8) 8(-141.75,-12.8) 9(-141.75,-38.39) 10(-141.75,-63.98) 11(-141.75,-89.57) 12(-141.75,-115.16) 13(-141.75,-140.75) 14(-141.75,-166.34) 15(141.75,-166.34) 16(141.75,-140.75) 17(141.75,-115.16) 18(141.75,-89.57) 19(141.75,-63.98) 20(141.75,-38.39) 21(141.75,-12.8) 22(141.75,12.8) 23(141.75,38.39) 24(141.75,63.98) 25(141.75,89.57) 26(141.75,115.16) 27(141.75,140.75) 28(141.75,166.34)
  silkscreen extent -194,-210 194,210, body extent -159,-204 159,204, height 79
SULLINS_PPTC061LFBN-RC [mm]
  rect 1.605x1.605 / inner round 1.605 / far side rect 1.605x1.605 hole 1.07: 1(-6.35,0)
  round 1.605 hole 1.07: 2(-3.81,0) 3(-1.27,0) 4(1.27,0) 5(3.81,0) 6(6.35,0)
  silkscreen extent -8.6,-1.27 7.87,1.27, body extent -7.87,-1.27 7.87,1.27, height 8.51
TE_3-644456-2 [mm]
  rect 1.37x1.37 / inner round 1.37 / far side rect 1.37x1.37 hole 1.02: 1(0,0)
  round 1.37 hole 1.02: 2(2.54,0)
  silkscreen extent -1.87,-1.17 3.66,1.17, body extent -1.12,-1.17 3.66,1.17, height 10.03
TE_644884-3 [mm]
  rect 1.37x1.37 / inner round 1.37 / far side rect 1.37x1.37 hole 1.02 mask+0.102: 1(0,0)
  round 1.37 hole 1.02 mask+0.102: 2(2.54,0) 3(5.08,0)
  silkscreen extent -1.87,-1.17 6.2,1.17, body extent -3.66,-7.49 3.66,5.33, height 1.17
TOSH-SSOP-24_M [mm] "SOP, 24-Leads, Body 8x5.8mm, Pitch 0.65mm, IPC Low Density"
  oval 1.6x0.45 smd: 1(-3.7,3.575) 2(-3.7,2.925) 3(-3.7,2.275) 4(-3.7,1.625) 5(-3.7,0.975) 6(-3.7,0.325) 7(-3.7,-0.325) 8(-3.7,-0.975) 9(-3.7,-1.625) 10(-3.7,-2.275) 11(-3.7,-2.925) 12(-3.7,-3.575) 13(3.7,-3.575) 14(3.7,-2.925) 15(3.7,-2.275) 16(3.7,-1.625) 17(3.7,-0.975) 18(3.7,-0.325) 19(3.7,0.325) 20(3.7,0.975) 21(3.7,1.625) 22(3.7,2.275) 23(3.7,2.925) 24(3.7,3.575)
  silkscreen extent -3.82,-4 2.5,4.47, body extent -3.8,-4 3.8,4, height 1.6
TP#1 [mil]
  round 60 smd far side: TP(0,0)
TP#2 [mil]
  round 60 smd: TP(0,0)
? [mm]
  round 0.1 smd paste-0.05: 1(0,0)
  Top Layer region: 0,-0.5 0,-0.51 0.195,-0.471 0.36,-0.36 0.471,-0.195 0.509,0 0.471,0.195 0.36,0.36 0.195,0.471 0,0.51 0,0.51 -0.195,0.471 -0.36,0.36 -0.471,0.195 -0.509,0 -0.471,-0.195 -0.36,-0.36 -0.195,-0.471 0,-0.51 0,-5 0,-5.01 0.65,-4.968 1.293,-4.84 1.914,-4.629 2.501,-4.339 3.046,-3.975 3.539,-3.543 3.971,-3.05 4.335,-2.505 4.625,-1.918 4.836,-1.297 4.964,-0.654 5.007,0 4.964,0.654 4.836,1.297 4.625,1.918 4.335,2.505 3.971,3.05 3.539,3.543 3.046,3.975 2.501,4.339 1.914,4.629 1.293,4.84 0.65,4.968 0,5.01 0,5.01 -0.65,4.968 -1.293,4.84 -1.914,4.629 -2.501,4.339 -3.046,3.975 -3.539,3.543 -3.971,3.05 -4.335,2.505 -4.625,1.918 -4.836,1.297 -4.964,0.654 -5.007,0 -4.964,-0.654 -4.836,-1.297 -4.625,-1.918 -4.335,-2.505 -3.971,-3.05 -3.539,-3.543 -3.046,-3.975 -2.501,-4.339 -1.914,-4.629 -1.293,-4.84 -0.65,-4.968 0,-5.01

## Part data
C1 C2 C4 C7 C14 C26 C27 C29: library part 1206ZD226MAT2A, "0,1 ÂµF Â±%10 16V Seramik KondansatÃ¶r X7R 0402 (1005 Metrik)", Package="3216 AVX", Check_prices=https://www.snapeda.com/parts/1206ZD226MAT2A/AVX/view-part/?ref=eda, MF=AVX, MP=1206ZD226MAT2A, SnapEDA_Link=https://www.snapeda.com/parts/1206ZD226MAT2A/AVX/view-part/?ref=snap
  C7: Simulation ModelName=C_Capacitor_Default, Simulation ModelText="C_Capacitor_Default 1 0 1p", Simulation PortMap=(1:1),(2:2)
C3 C5 C6 C8 C9 C10 C11 C12 C13 C15 C16 C17 C18 C19 C20 C22 C25 C28 C30 C31 C32 C33 C34 C35 C36 C37 C38: library part C0402T104K4RACTU, "Cap Ceramic 0.1uF 16V X7R 10% SMD 0402 85Â°C Punched Paper T/R", Package="0402 KEMET", Check_prices=https://www.snapeda.com/parts/C0402T104K4RACTU/KEMET/view-part/?ref=eda, MF=KEMET, MP=C0402T104K4RACTU, SnapEDA_Link=https://www.snapeda.com/parts/C0402T104K4RACTU/KEMET/view-part/?ref=snap
  C9 C10 C11 C12 C13 C15 C16 C19 C20: Simulation ModelName=C_Capacitor_Default, Simulation ModelText="C_Capacitor_Default 1 0 1p", Simulation PortMap=(1:1),(2:2)
C21: "10 ÂµF Molded Tantalum Capacitors 16 V 1206 (3216 Metric) 3Ohm", Package="SMD-2 KEMET", Check_prices=https://www.snapeda.com/parts/T491A106K016AG/Kemet/view-part/?ref=eda, MF=KEMET, MP=T491A106K016AG, SnapEDA_Link=https://www.snapeda.com/parts/T491A106K016AG/Kemet/view-part/?ref=snap
C23 C24: "220uF Solid MnO2 Tantalum Electrolytic Capacitor, 16 V dc +/-10%, T491 Series", Package="SMD-2 KEMET", Check_prices=https://www.snapeda.com/parts/T491D227K016AT/KEMET/view-part/?ref=eda, MF=KEMET, MP=T491D227K016AT, SnapEDA_Link=https://www.snapeda.com/parts/T491D227K016AT/KEMET/view-part/?ref=snap
CR1: "Description", Manufacturer_Name="Littelfuse Inc", Copyright="Copyright (C) 2026 Ultra Librarian. All rights reserved.", Manufacturer_Part_Number=SMBJ5.0A
D1 D2 D3 D4 D5 D6 D7 D8 D11 D12 D13 D14 D15 D18 D20: library part SML-LXT0805IW-TR, "LED;Red;11mcd;0.061In.Dia.;SMD;100mA;2V Vf;635nm;140deg;SMD;White Diffused;5V Vr", Package="0805 Lumex", Check_prices=https://www.snapeda.com/parts/SML-LXT0805IW-TR/Lumex+Opto%252FComponents+Inc./view-part/?ref=eda, MF="Lumex Opto/Components", MP=SML-LXT0805IW-TR, SnapEDA_Link=https://www.snapeda.com/parts/SML-LXT0805IW-TR/Lumex+Opto%252FComponents+Inc./view-part/?ref=snap
D9 D10: library part CMP-0902-00143-1, "Standard Recovery Rectifier, 2-Pin Axial_Lead, Pb-Free, Bulk Bag", Manufacturer="On Semiconductor", PartNumber=1N4007G, ComponentLink1Description="Manufacturer URL", ComponentLink1URL=http://www.onsemi.com/, ComponentLink2Description=Datasheet, ComponentLink2URL=http://www.onsemi.com/pub_link/Collateral/1N4001-D.PDF, ComponentLink3Description="Package Specification", ComponentLink3URL=http://www.onsemi.cn/pub_link/Collateral/59-10.PDF, DatasheetVersion="Rev. 13", IFSM Max (A)=30, IO(rec) Max (A)=1, Mounting Technology="Through Hole", PackageDescription="2-Pin, Axial Lead, Diameter 2.35 mm", PackageReference=AXIAL_LEAD-2-59-10, PackageVersion="Rev. U, 02/2005", Packing="Bulk Bag", RoHS=TRUE, Type="Standard Recovery", VRRM Max (V)=1000
DS1: "Display Modules - LED Character and Numeric Yellow 7-Segment 1 Character Common Anode 2.15V 20mA 0.673 H x 0.488 W x 0.315 D (17.10mm x 12.40mm x 8.00mm) 10-DIP (0.600, 15.24mm)", Package=None, Check_prices=https://www.snapeda.com/parts/HDSP-511Y/Broadcom/view-part/?ref=eda, MF="Broadcom Limited", MP=HDSP-511Y, SnapEDA_Link=https://www.snapeda.com/parts/HDSP-511Y/Broadcom/view-part/?ref=snap
F1: library part 0467001.NRHF, "Surface Mount Fuses 32V 0603 1A V/FA HALIDE FREE", Manufacturer_Name=LITTELFUSE, Mouser Part Number=576-0467001.NRHF, Manufacturer_Part_Number=0467001.NRHF, Geometry.Height=0.432mm, Mouser Price/Stock=https://www.mouser.co.uk/ProductDetail/Littelfuse/0467001NRHF?qs=n5MbhIql%252BRmX3ko2b0IFNg%3D%3D
IC1 IC2: "Linear Voltage Regulator IC Positive Fixed 1 Output 1A SOT-223", Package=None, Check_prices=https://www.snapeda.com/parts/NCP1117/Onsemi/view-part/?ref=eda, MF="ON Semiconductor", MP=NCP1117, SnapEDA_Link=https://www.snapeda.com/parts/NCP1117/Onsemi/view-part/?ref=snap
J1 J2 J3 J4: "CONN HDR 15POS 0.1 TIN PCB", Manufacturer_Name=Sullins, Datasheet Link=https://www.digikey.com/en/products/detail/sullins-connector-solutions/PPTC151LFBN-RC/810153, Geometry.Height=8.5mm, Manufacturer_Part_Number=PPTC151LFBN-RC
J5 J8 J14: "HEADER ASSEMBLY, NARROW, MTA-100, 2 POSITION, STRAIGHT", Package=None, Check_prices=https://www.snapeda.com/parts/3-644456-2/TE+Connectivity+AMP+Connectors/view-part/?ref=eda, MF="TE Connectivity", MP=3-644456-2, SnapEDA_Link=https://www.snapeda.com/parts/3-644456-2/TE+Connectivity+AMP+Connectors/view-part/?ref=snap
J6: "Power Barrel Connector Jack 2.05mm ID (0.081), 5.50mm OD (0.217) Through Hole, Right Angle", Package=None, Check_prices=https://www.snapeda.com/parts/DCJ200-10-A-K1-K/Global+Connector+Technology/view-part/?ref=eda, MF="Global Connector Technology", MP=DCJ200-10-A-K1-K, SnapEDA_Link=https://www.snapeda.com/parts/DCJ200-10-A-K1-K/Global+Connector+Technology/view-part/?ref=snap
J7: "Micro SD Card Connector, 9 Positions, Connector and Ejector, Push In, Auto Eject Out, Surface Mount, 1.8 mm Height Above Board, Gold Flash", Package=None, Check_prices=https://www.snapeda.com/parts/MSD-1-A/Same+Sky/view-part/?ref=eda, MF="Same Sky", MP=MSD-1-A, SnapEDA_Link=https://www.snapeda.com/parts/MSD-1-A/Same+Sky/view-part/?ref=snap
J9 J10 J15: library part CMP-1502-03324-2, Current Rating=16A, Max Operating Temperature=120°C, Min Operating Temperature=-30°C, Voltage Rating=300V, Contact Material="Nickel, Tin", Height=11.6mm, Lead Pitch=5mm, NexarPartId=78871135, Number of Contacts=2, Number of Pins=2, Number of Rows=1, Packaging=Box, RoHS=Non-Compliant
J11: library part CMP-002-00228-1, "6 Position Header Connector 0.100 (2.54mm) Through Hole Tin", Case/Package=None, Check_prices=https://www.snapeda.com/parts/PPTC061LFBN-RC/Sullins+Connector+Solutions/view-part/?ref=eda, Component Type=Standard, Design Item ID=PPTC061LFBN-RC_1, MF="Sullins Connector", MP=PPTC061LFBN-RC, Pins=6, SnapEDA_Link=https://www.snapeda.com/parts/PPTC061LFBN-RC/Sullins+Connector+Solutions/view-part/?ref=snap, Source=Maze_Solver_2_Layer.SCHLIB
J12 J13 J16 J18 J19 J22: "Conn Unshrouded Header HDR 3 POS 2.54mm Solder ST Thru-Hole Bag/Box", Package=None, Check_prices=https://www.snapeda.com/parts/644884-3/TE+Connectivity+AMP+Connectors/view-part/?ref=eda, EU_RoHS_Compliance=Compliant, MF="TE Connectivity", MP=644884-3, SnapEDA_Link=https://www.snapeda.com/parts/644884-3/TE+Connectivity+AMP+Connectors/view-part/?ref=snap
J24: library part CMP-00254-10533681-1, "Headers & Wire Housings SPRING LOADED HEADER 1R 8P VERT MNT TH", Current Rating=2A, Max Operating Temperature=125°C, Min Operating Temperature=-55°C, Voltage Rating=150V, Contact Gender=Male, Contact Material="Gold, Nickel", Contact Plating=Gold, Height=7.92mm, Lead Free="Lead Free", Number of Contacts=8, Number of Positions=8, Number of Rows=1, Pitch=2.54mm, REACH SVHC="No SVHC", RoHS=Compliant, Row Spacing=2.54mm, Termination="Through Hole"
K1 K2: "5V Trigger Relay Module For Arduino And Raspberry Pi 5V Trigger Relay Module For Arduino And Raspberry Pi", Package="NON STANDARD-5 Songle Relay", Availability="Not in stock", Check_prices=https://www.snapeda.com/parts/SRD-05VDC-SL-C/Songle+Relay/view-part/?ref=eda, MF="Songle Relay", MP=SRD-05VDC-SL-C, Price=None, SnapEDA_Link=https://www.snapeda.com/parts/SRD-05VDC-SL-C/Songle+Relay/view-part/?ref=snap
Q1: "Insulated-Gate Field-Effect Transistor (IGFET), P-Channel, Enhancement,  Body Diode, Pin 1 Gate, 2 Source, 3 Drain, 3 Pins", Manufacturer="Infineon Technologies", Manufacturer Order Number=IRLML2244, PackageReference=PG-SOT23-3-901
Q2 Q3: "Bipolar (BJT) Transistor NPN 30 V 600 mA 250MHz 300 mW Surface Mount SOT-23-3 (TO-236)", Package="SOT-23-3 Fairchild Semiconductor", Check_prices=https://www.snapeda.com/parts/MMBT2222/Onsemi/view-part/?ref=eda, MF="ON Semiconductor", MP=MMBT2222, SnapEDA_Link=https://www.snapeda.com/parts/MMBT2222/Onsemi/view-part/?ref=snap
R1 R2 R3 R4 R5 R6 R7 R8 R9 R10 R11 R12 R13 R14 R16 R17 R18 R19 R20 R21 R23 R25 R26 R27 R34 R36 R37 R38 R39 R40 R41 R42 R43 R44 R45 R46 R47 R48 R49 R50 R51 R52 R53 R54 R55 R56 R57 R58 R59 R60 R61 R62 R63 R64 R65 R66 R67 R68: library part RL0402FR-070R1L, "100 mOhms Â±1% 0.063W, 1/16W Chip Resistor 0402 (1005 Metric) Automotive AEC-Q200, Current Sense, Moisture Resistant Thick Film", Package="0402-2 Yageo", Check_prices=https://www.snapeda.com/parts/RL0402FR-070R1L/Yageo/view-part/?ref=eda, MF=Yageo, MP=RL0402FR-070R1L, SnapEDA_Link=https://www.snapeda.com/parts/RL0402FR-070R1L/Yageo/view-part/?ref=snap
  R2 R5 R6 R7 R8 R9 R10 R11 R12 R13 R14: Simulation ModelName=R_Resistor_Default, Simulation ModelText="R_Resistor_Default 1 0 1K", Simulation PortMap=(1:1),(2:2)
R15 R22: "1 kOhms Â±1% 0.063W, 1/16W Chip Resistor 0402 (1005 Metric) Moisture Resistant Thick Film", Package="0402-2 YAGEO", Check_prices=https://www.snapeda.com/parts/RC0402FR071KL/Yageo/view-part/?ref=eda, MF="Yageo Corporation", MP=RC0402FR071KL, SnapEDA_Link=https://www.snapeda.com/parts/RC0402FR071KL/Yageo/view-part/?ref=snap
S1 S2 S3 S4 S5 S6 S7 S8: "Dip Switch SPST 8 Position Through Hole Slide (Standard) Actuator 25mA 24VDC", Package=None, Check_prices=https://www.snapeda.com/parts/418117270908/W%25C3%25BCrth+Elektronik+Midcom/view-part/?ref=eda, MF="WÃ¼rth Elektronik", MP=418117270908, SnapEDA_Link=https://www.snapeda.com/parts/418117270908/W%25C3%25BCrth+Elektronik+Midcom/view-part/?ref=snap
S9 S10 S11 S12 S13 S14: "Tactile Switch SPST-NO Top Actuated Surface Mount", Package=None, Check_prices=https://www.snapeda.com/parts/PTS%20647%20SK38%20SMTR2%20LFS/C%2526K/view-part/?ref=eda, MF=C&K, MP="PTS 647 SK38 SMTR2 LFS", SnapEDA_Link=https://www.snapeda.com/parts/PTS%20647%20SK38%20SMTR2%20LFS/C%2526K/view-part/?ref=snap
T1: "IRLML2244TRPBF P-channel MOSFET Transistor, 4.3 A, 20 V, 3-Pin SOT-23", Package="SOT-23-3 ON Semiconductor", Check_prices=https://www.snapeda.com/parts/IRLML2244TRPBF/Infineon+Technologies/view-part/?ref=eda, MF=Infineon, MP=IRLML2244TRPBF, SnapEDA_Link=https://www.snapeda.com/parts/IRLML2244TRPBF/Infineon+Technologies/view-part/?ref=snap
U1: "Description", Manufacturer_Name="Cypress Semiconductor", Copyright="Copyright (C) 2026 Ultra Librarian. All rights reserved.", Manufacturer_Part_Number=CY8C9520A-24PVXIT, RefDes=RefDes, Type=Type
U2: "Optical Sensor Ambient 550nm IÂ²C 10-SMD Module", Package="SMD-10 Vishay", Availability=Unavailable, MF="Vishay Semiconductor", MP=VCNL4200, Price=None, SnapEDA_Link=https://www.snapeda.com/parts/VCNL4200/Vishay%20Semiconductor%20Opto%20Division/view-part/1174507/?ref=snap
U3: "2C digital temperature sensor, I2C/SMBus in 2.56mm2 package", Package="SOT-5X3-6 Texas Instruments", Availability="In Stock", Check_prices=https://www.snapeda.com/parts/TMP102AIDRLR/Texas+Instruments/view-part/?ref=eda, MF="Texas Instruments", MP=TMP102AIDRLR, Price=None, Purchase-URL=https://pricing.snapeda.com/search/part/TMP102AIDRLR/?ref=eda, SnapEDA_Link=https://www.snapeda.com/parts/TMP102AIDRLR/Texas+Instruments/view-part/?ref=snap
U4: "0.96â€ 128 X 64 MONOCHROME GRAPHIC OLED DISPLAY MODULE - I2C", Package=Package, Check_prices=https://www.snapeda.com/parts/DM-OLED096-636/Display+Module/view-part/?ref=eda, MF="Display Module", MP=DM-OLED096-636, SnapEDA_Link=https://www.snapeda.com/parts/DM-OLED096-636/Display+Module/view-part/?ref=snap
U5: "MPU-6050 series Accelerometer, Gyroscope, 3 Axis Sensor Evaluation Board", Package="QFN-24 InvenSense", Check_prices=https://www.snapeda.com/parts/MPU-6050/TDK+InvenSense/view-part/?ref=eda, MF="TDK InvenSense", MP=MPU-6050, SnapEDA_Link=https://www.snapeda.com/parts/MPU-6050/TDK+InvenSense/view-part/?ref=snap
U6: "EEPROM Memory IC 4Mb (512K x 8) SPI 10 MHz 8-SOIC", Package=None, Check_prices=https://www.snapeda.com/parts/M95M04-DRMN6TP/STMicroelectronics/view-part/?ref=eda, MF=STMicroelectronics, MP=M95M04-DRMN6TP, SnapEDA_Link=https://www.snapeda.com/parts/M95M04-DRMN6TP/STMicroelectronics/view-part/?ref=snap
U7: "OPTIGA™ TPM", Manufacturer="Infineon Technologies", ManufacturerPartNumber="SLB 9670VQ2.0", PackageReference=PG-VQFN-32-13
U8: library part CMP-00024-00005-2, "Driver IC for Dual DC Motor, 15 V, -20 to 85 degC, 24-Pin SSOP, RoHS, Tape and Reel", Case/Package=SSOP-24, Manufacturer=Toshiba, Package Description="24-Pin Shrink Small Outline Package Integrated Circuit, Body 7.8 x 5.6 mm, Pitch 0.65 mm", Datasheet URL=https://toshiba.semicon-storage.com/info/docget.jsp?did=10660&prodName=TB6612FNG, Datasheet Version=Oct-14, Manufacturer URL=http://www.toshiba.com/, Mounting Technology=SM, Package Reference=SSOP-24, RoHS Compliant=False
U9: "ESP-01M ESP8266 DIP Adapter series Transceiver; 802.11 b/g/n (Wi-Fi, WiFi, WLAN) Evaluation Board", Package="Non-Standard AI-Thinker", Check_prices=https://www.snapeda.com/parts/ESP-01/AI-Thinker/view-part/?ref=eda, MF=AI-Thinker, MP=ESP-01, SnapEDA_Link=https://www.snapeda.com/parts/ESP-01/AI-Thinker/view-part/?ref=snap
VR1: library part CMP-009-00039-2, "Square Trimpot(R) Trimming Potentiometer, 10 KOhm, 300 V, -55 to 125 degC, 3-Pin THD, RoHS, Tube", Case/Package=3326P, Manufacturer=Bourns, Max Operating Temperature=125°C, Min Operating Temperature=-55°C, Package Description="3-Pin Through Hole Device, Body 6.6 x 6.99 mm, Pitch 2.54 mm", Package Quantity=250, Power=500mW, Resistance=10k, Tolerance=10%, Voltage Rating=300V, Composition=Potentiometer, Datasheet URL=http://www.bourns.com/docs/Product-Datasheets/3362.pdf, Datasheet Version=May-16, Lead Pitch=2.54mm, Manufacturer URL=http://www.bourns.com/, Mounting Technology=TH, Package Reference=3326P, Packaging=Rail/Tube, Pins=3, RoHS Compliant=True
CS1: ConfigurationParameters==__sensorid[CircularButton]=outerDiameter[10]=innerDiameter[0]=, ConfiguratorName=CYPRESS_TOUCH

## Free pads (board coordinates)
  round 4.318 hole 3.2: 666(5.969,199.822) 666(6.076,5.652) 666(234.239,199.771)
  round 4.318 hole 3.226: 666(234.193,5.246)

## Via types
v1: diameter 0.61, hole 0.305, Top Layer to Bottom Layer, tented both sides, 162 vias
v2: diameter 0.61, hole 0.305, Top Layer to Bottom Layer, 64 vias

## Nets (pads, with @x,y where several pads share a name; then routed paths per layer and width w, separated by ;. In a path a pad name is that pad's centre, name@x,y a point inside that pad or via, vN(x,y) a via of type N, cw(c..) or ccw(c..) an arc to the next point about the centre after c; other vN are vias at no path point)
1: R61.1 U1.1 | length 7.7
  Top Layer w0.254: U1.1@168.026,48.26 168.677,48.26 173.203,52.786 R61.1@173.203,53.464
2: R58.1 U1.2 | length 6.5
  Top Layer w0.254: U1.2@167.376,48.26 167.376,49.341 170.566,52.532 170.566,53.444 R58.1@170.586,53.464
3: R62.1 U1.3 | length 5.8
  Top Layer w0.254: U1.3@166.726,48.26 166.726,50.394 168.097,51.765 R62.1@168.097,53.464
3V3: *8.TP C2.2 C6.1 C8.1 C17.2 C18.2 C23.1 C25.1 C26.2 C27.2 C28.1 C37.1 C38.1 DS1.3 DS1.8 IC2.2 IC2.4 J7.4 R4.1 R16.1 R18.2 R19.2 R20.1 R21.1 R23.1 R25.2 R26.2 R27.2 R34.1 R36.1 R37.1 R38.2 R39.2 U6.8 U7.1 U7.8 U7.14 U7.22 U9.5 | length 363.2
  Top Layer w0.254: U9.5@28.499,23.575 28.499,24.879 27.94,25.438 C28.1@27.94,26.545 27.994,26.599 28.403,26.599 29.21,27.407 29.721,27.407 R36.1@29.743,27.384 29.756,27.397 35.827,27.397 R37.1@35.839,27.41 ; R23.1@148.053,12.141 148.206,11.988 148.206,11.551 148.635,11.123 148.635,10.958 C17.2@148.768,10.825 ; v1(186.868,19.126) 186.891,19.103 C25.1@187.909,19.103 187.93,19.103 188.072,18.961 188.072,18.94 188.243,18.768 188.243,15.674 U7.22@188.245,15.672 ; C8.1@187.245,9.42 187.245,11.183 U7.1@187.251,11.189 ; v1(188.239,34.392) 188.307,34.392 189.151,35.235 R26.2@189.151,35.255 ; v1(188.333,32.368) 188.401,32.436 188.544,32.436 189.151,33.042 R27.2@189.151,33.062 ; R25.2@189.151,30.378 189.114,30.342 189.114,29.373 v1(189.078,29.337) 189.078,29.241 189.357,28.961 R16.1@189.357,22.508 189.359,22.506 189.99,22.506 v1(189.992,22.504) ; U7.8@190.757,11.024 190.779,11.002 C6.1@190.779,9.549 ; R20.1@190.983,19.072 191.033,19.123 191.515,19.123 192.156,19.764 192.404,19.764 R21.1@192.557,19.917 192.71,20.07 192.71,19.923 192.73,19.903 v1@193.534,19.903 ; U7.14@191.401,14.339 194.752,14.339 C26.2@195.045,14.046 195.045,18.925 194.081,19.888 v1(193.548,19.888)
  Top Layer w0.508: C37.1@67.461,9.068 67.461,9.038 67.477,9.022 71.014,9.022 DS1.3@77.394,2.642 ; C38.1@77.394,20.093 DS1.8@77.394,17.882 77.394,15.697 78.74,14.351 98.333,14.351 102.653,18.672 R4.1@109.601,18.672 ; R4.1@109.621,18.698 113.287,18.698 114.085,17.9 115.331,17.9 115.413,17.818 C18.2@115.443,17.818 115.456,17.818 115.456,17.234 v1(115.468,17.221) ; J7.4@115.051,15.47 115.051,16.777 115.449,17.174 v1@115.449,17.21 ; C18.2@115.456,17.9 115.87,17.9 116.642,18.672 117.237,18.672 R34.1@117.237,18.673 ; v1@147.701,8.909 148.025,8.909 148.752,9.636 148.752,10.809 C17.2@148.768,10.825 148.772,10.82 U6.8@152.363,10.82 152.376,10.808 154.089,10.808 v1(154.102,10.795) ; R19.2@161.62,13.386 161.622,13.384 R18.2@161.622,10.797 ; R18.2@161.623,10.795 161.623,10.775 161.982,10.417 161.982,10.078 v1(162.001,10.058) ; v1(184.861,6.68) 184.861,8.28 186.001,9.42 C8.1@187.223,9.42 ; C6.1@190.779,9.549 191.65,9.549 192.786,8.413 v1(192.786,6.68) 194.716,6.68 195.045,7.009 C26.2@195.045,14.046
  Top Layer w1.016: IC2.2@18.694,12.628 18.694,8.992 v2(18.644,8.941) 18.644,7.214 v2(18.847,7.01) ; v2(18.694,12.929) 18.694,22.045 C23.1@18.364,22.376 18.394,22.376 19.567,23.548 22.449,23.548 C27.2@22.504,23.493 28.417,23.493 U9.5@28.499,23.575 ; C2.2@18.874,2.972 IC2.4@18.874,6.269
  Bottom Layer w0.254: v1(186.868,19.126) 187.623,19.881 188.751,19.881 ; v1(188.239,34.392) 188.286,34.345 188.286,32.414 v1(188.333,32.368) 188.333,30.082 v1(189.078,29.337) ; v1(189.992,22.504) 189.992,21.122 188.751,19.881 ; v1@193.541,19.881 188.751,19.881
  Bottom Layer w0.508: v1(115.468,17.221) 115.468,9.576 116.154,8.89 v1(147.701,8.89) 147.701,7.417 148.565,6.553 166.636,6.553 166.763,6.68 v1(184.861,6.68) v1(192.786,6.68) ; v1(154.102,10.795) 161.237,10.795 161.974,10.058 v1(162.001,10.058)
  Bottom Layer w1.016: *8.TP@10.82,11.786 10.82,8.814 12.827,6.807 v2@17.886,6.807 ; v2@19.71,6.807 20.599,6.807 23.139,4.267 75.768,4.267 DS1.3@77.394,2.642 DS1.8@77.394,17.882
  other v2: 18.846,6.269 17.881,6.295 19.71,6.35 17.886,7.006 19.761,7.036 18.694,9.931 18.72,10.82 18.669,12.09
4: R63.1 U1.4 | length 5.5
  Top Layer w0.254: R63.1@165.329,53.464 165.329,52.753 165.349,52.753 166.076,52.026 U1.4@166.076,48.26
5: R59.1 U1.5 | length 6.3
  Top Layer w0.254: R59.1@162.89,53.464 162.91,53.444 162.91,52.638 165.426,50.123 U1.5@165.426,48.26
6: R60.1 U1.6 | length 8.1
  Top Layer w0.254: R60.1@160.274,53.438 160.274,52.443 160.85,51.867 162.727,51.867 164.776,49.818 U1.6@164.776,48.26
7: R64.1 U1.7 | length 9.7
  Top Layer w0.254: R64.1@158.166,53.464 158.166,52.239 159.046,51.359 162.516,51.359 164.126,49.75 U1.7@164.126,48.26
8: R65.1 U1.8 | length 11.4
  Top Layer w0.254: R65.1@155.499,53.464 155.499,52.649 157.297,50.851 162.306,50.851 163.422,49.734 163.422,48.313 U1.8@163.476,48.26
+5: *11.TP C3.1 C4.2 C14.2 C29.2 C30.1 D9.1 D10.1 IC1.3 IC2.3 J19.1 K1.A1 K2.A1 Q1.2 R15.2 R17.2 R22.2 | length 584.1
  Top Layer w0.254: R17.2@167.561,187.173 167.561,179.378 168.631,178.308 v2(193.015,178.308)
  Top Layer w0.5: J19.1@36.424,114.884 36.859,114.449 37.053,114.449 37.151,114.351 C30.1@40.337,114.351 40.337,115.719 C29.2@40.335,115.721 ; R15.2@214.632,160.096 214.632,161.114 216.535,163.017 v1(229.972,163.017) ; R15.2@214.635,160.096 D10.1@214.635,154.254 214.673,154.216 214.673,139.611 D9.1@214.711,139.573 R22.2@214.711,132.617
  Top Layer w1.016: IC1.3@192.84,181.14 IC1.3@192.848,181.132 ; C14.2@192.884,185.903 192.884,186.233 194.091,187.439 194.091,187.623 194.809,188.341 204.611,188.341 205.207,187.746 205.207,161.112 206.324,159.995 214.358,159.995 R15.2@214.46,160.096
  Top Layer w1.5: C4.2@16.104,15.621 7.391,15.621 5.359,17.653 5.359,112.497 7.747,114.884 J19.1@36.424,114.884 36.424,181.712 40.361,185.649 83.388,185.649 84.252,184.785 v1(84.252,176.352) ; C4.2@16.322,15.621 16.332,15.611 16.332,13.056 v2(16.358,13.03) 16.358,12.665 IC2.3@16.394,12.628 ; v1@84.293,176.405 84.346,176.352 v1(85.52,176.352)
  Bottom Layer w0.254: v2(191.749,177.618) 191.749,174.548 192.916,173.381 203.099,173.381 *11.TP@205.359,175.641
  Bottom Layer w0.5: D9.1@214.711,139.573 214.711,114.6 216.84,112.471 233.129,112.471 K1.A1@235.644,114.986 ; v1(229.972,163.017) 232.775,163.017 K2.A1@235.538,165.78
  Bottom Layer w1.5: v1@84.346,176.352 v1(85.52,176.352) 190.483,176.352 v2(191.749,177.618) 192.439,178.308 v2(193.015,178.308)
  other v2: 16.332,12.141 193.015,177.317 193.015,179.334 192.593,180.466 193.635,180.466 193.624,181.321 192.583,181.346 193.634,182.291 192.593,182.316
A: J24.1 R43.2 S5.A4 | length 106.1
  Top Layer w0.254: v1(79.832,24.79) 79.883,24.74 79.883,20.907 R43.2@79.934,20.857
  Bottom Layer w0.254: v1(79.832,24.79) 79.883,24.74 84.151,24.74 86.208,26.796 J24.1@86.208,29.388 86.065,29.531 86.065,30.928 74.016,42.977 74.016,104.137 S5.A4@82.873,112.994
AIN1: S3.6 U8.21 | length 167.9
  Top Layer w0.254: S3.6@156.007,140.818 153.264,140.818 152.324,139.878 152.324,66.301 154.439,64.186 195.647,64.186 196.493,63.34 196.744,63.34 v1(196.812,63.272) ; v1(224.552,49.555) 224.587,49.52 U8.21@224.587,46.905
  Bottom Layer w0.254: v1(196.812,63.272) 224.111,63.272 225.222,62.161 225.222,50.154 224.623,49.555 v1(224.552,49.555)
AIN2: S3.7 U8.22 | length 171.1
  Top Layer w0.254: S3.7@156.007,143.358 152.654,143.358 151.638,142.342 151.638,66.269 154.305,63.602 195.513,63.602 196.705,62.409 v1(196.77,62.409) ; U8.22@223.937,46.905 223.9,46.943 223.9,47.657 223.893,47.663 223.893,47.731 223.839,47.785 223.839,50.669 224.488,51.318 v1(224.536,51.318)
  Bottom Layer w0.254: v1(196.77,62.409) 224.255,62.409 224.536,62.128 v1(224.536,51.318)
B: J24.2 R45.2 S5.A5 | length 103.3
  Top Layer w0.254: R45.2@82.575,20.857 82.575,27.153 83.668,28.245 J24.2@83.668,29.388
  Bottom Layer w0.254: S5.A5@82.873,115.534 82.873,115.249 73.457,105.833 73.457,101.743 73.508,101.692 73.508,41.25 83.668,31.09 J24.2@83.668,29.388
BT_1: C31.1 R44.1 S6.3 S9.1 S9.2 | length 38.3
  Top Layer w0.254: S6.3@156.007,111.176 182.629,111.176 182.793,111.176 C31.1@183.236,111.176 183.193,111.218 183.193,111.65 180.996,113.847 180.996,114.52 180.936,114.58 S9.2@180.661,114.58 ; S9.2@180.905,114.666 181.192,114.953 181.709,114.953 185.538,114.953 S9.1@185.911,114.58 ; R44.1@183.202,110.007 C31.1@183.202,111.171
BT_2: C32.1 R51.2 S1.4 S10.1 S10.2 | length 98.4
  Top Layer w0.254: v1(160.579,157.378) 160.579,120.98 161.925,119.634 195.876,119.634 197.019,118.491 S10.1@197.019,117.678 S10.2@202.269,117.678 203.581,117.678 204.089,117.17 204.089,111.303 202.845,110.059 R51.2@200.409,110.059 200.381,110.087 200.381,111.657 C32.1@200.353,111.684
  Bottom Layer w0.254: S1.4@156.007,157.709 160.152,157.709 160.483,157.378 v1(160.579,157.378)
C: J24.3 R46.2 S5.A6 | length 134
  Top Layer w0.254: R46.2@66.599,10.82 66.036,10.82 65.888,10.969 65.888,30.404 67.158,31.674 80.315,31.674 81.128,30.861 J24.3@81.128,29.388
  Bottom Layer w0.254: J24.3@81.128,29.388 81.061,29.454 81.061,31.08 73,39.141 73,100.085 72.949,100.136 72.949,103.635 72.923,103.66 72.923,108.125 S5.A6@82.873,118.074
CARD_D: J7.CD R4.2 S5.A1 | length 124.1
  Top Layer w0.254: v1(78.933,63.502) 79.299,63.868 79.299,101.8 S5.A1@82.873,105.374 ; v1(108.102,17.859) 108.134,17.828 R4.2@109.601,17.828 109.576,17.803 109.576,15.495 J7.CD@109.551,15.47